# Altium PCB PCB.PcbDoc (part 2 of 9)
Units mil, origin at the board's own origin, x right, y up, seen from the top; angles counter-clockwise.
Board outline 4330.71 x 3149.61 mil, 8 copper layers (L1_TOP, L2_GND, L3_SIG, L4_PWR, L5_PWR, L6_SIG, L7_GND, L8_BOT), stack 62.406 mil thick; 660 components, 433 nets, 2602 pads, 1254 vias.
Unrouted connection lines stored in the file: 930.
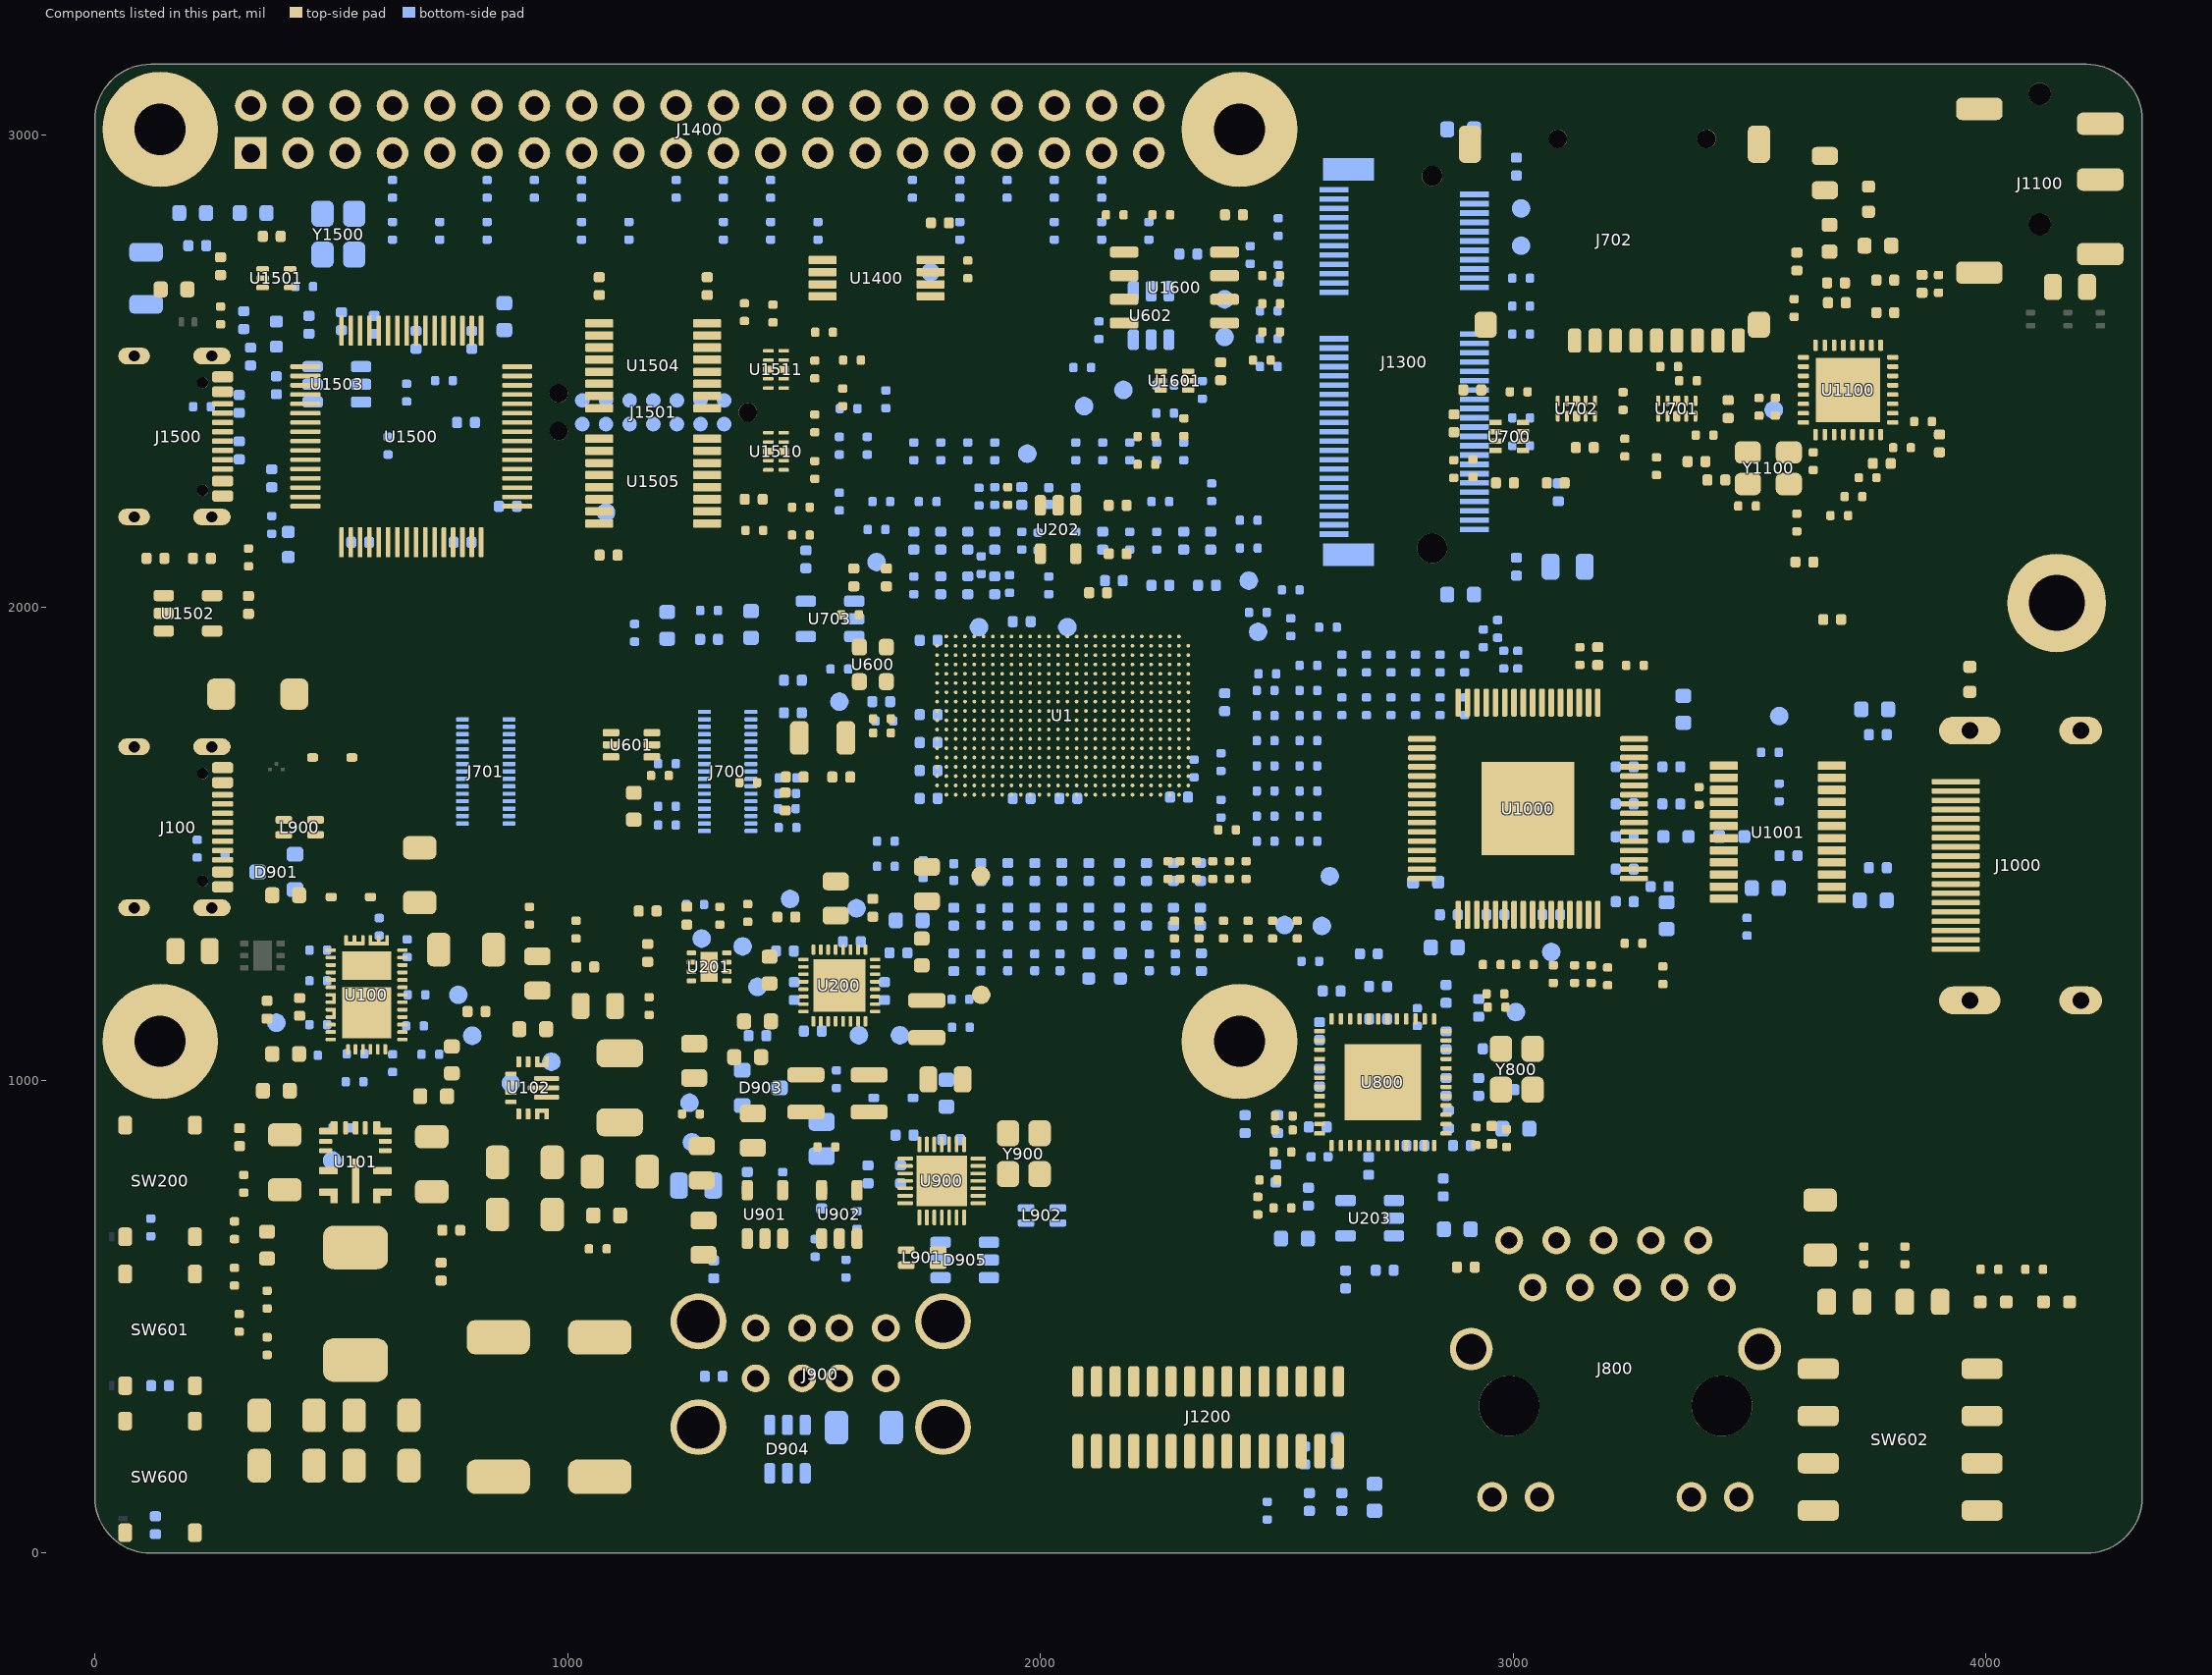
[diagram p6: the components of this part, seen from the top]

## Components (designator, comment, footprint, x,y, rotation, side; value= is the part's Value field where it differs from the comment) (continued)
R121 "100k" R0402 1172.24,1157.48 r270 top
R122 "100k" R0402 1017.72,1318.9 r270 top
R123 "680k" R0402 1063.98,643.7 r180 top
R124 "130k" R0402 1260.83,929.13 r0 top
R125 "100k" R0402 919.29,1348.43 r270 top
R200 "10k" R0402 118.11,688.98 r270 bottom
R201 "2.2k" R0402 1321.85,1348.43 r270 top
R202 "10k" R0402 2263.78,2470.47 r180 bottom
R203 "62R" R0402 2246.06,2141.73 r90 bottom
R204 "10k" R0402 2440.95,2125.98 r180 bottom
R205 "10k" R0402 1380.91,1354.33 r270 top
R206 "100k" R0402 1931.1,2236.22 r90 top
R208 "10k" R0402 1663.39,2224.41 r180 bottom
R209 "10k" R0402 1547.24,859.25 r0 top
R210 "10k" R0402 1653.54,2165.35 r180 bottom
R301 "40.2k" R0402 1903.54,2236.22 r90 bottom
R302 "4.87k" R0402 1870,2235 r270 bottom
R600 "22R" R0402 1665,1765 r0 top
R601 "10k" R0402 1597.44,1985.24 r0 top
R603 "10M" R0402 1665,1735 r0 top
R604 "10k" R0402 1601.69,2523.62 r180 top
R605 "10k" R0402 1381.89,1629.92 r0 top
R606 "4.7k" R0402 1195,1645 r0 top
R607 "10k" R0402 2124.02,2586.61 r270 bottom
R608 "10k" R0402 2088.58,2507.87 r0 bottom
R609 "10k" R0402 2263.78,2411.42 r180 bottom
R610 "10k" R0402 1574.8,2224.41 r270 bottom
R611 "10k" R0402 2460,1990 r0 bottom
R612 "10k" R0402 2381.89,1673.23 r270 bottom
R613 "10k" R0402 1574.8,1870.08 r180 bottom
R620 "10k" R0402 2476.38,1505.91 r0 bottom
R621 "10k" R0402 2566.93,1505.91 r0 bottom
R622 "10k" R0402 2476.38,1559.05 r0 bottom
R623 "10k" R0402 2566.93,1559.05 r0 bottom
R624 "10k" R0402 2476.38,1612.2 r0 bottom
R625 "10k" R0402 2566.93,1612.2 r0 bottom
R626 "10k" R0402 2480,1860 r0 bottom
R627 "10k" R0402 2566.93,1877.95 r0 bottom
R628 "10k" R0402 2980,1890 r270 bottom
R629 "10k" R0402 3010,1890 r90 bottom
R630 "10k" R0402 2937.2,1935.24 r270 bottom
R631 "10k" R0402 2967.28,1955.16 r90 bottom
R632 "10k" R0402 2897.64,1881.89 r270 bottom
R633 "10k" R0402 2897.64,1791.34 r270 bottom
R634 "10k" R0402 2845.67,1881.89 r270 bottom
R635 "10k" R0402 2845.67,1791.34 r270 bottom
R636 "10k" R0402 2793.7,1881.89 r270 bottom
R637 "10k" R0402 2793.7,1791.34 r270 bottom
R638 "10k" R0402 2741.73,1881.89 r270 bottom
R639 "10k" R0402 2741.73,1791.34 r270 bottom
R640 "10k" R0402 2689.76,1881.89 r270 bottom
R641 "10k" R0402 2689.76,1791.34 r270 bottom
R642 "10k" R0402 2637.8,1881.89 r270 bottom
R643 "10k" R0402 2637.8,1791.34 r270 bottom
R644 "1k" R0402 2476.38,1665.35 r0 bottom
R645 "47k" R0402 2566.93,1665.35 r0 bottom
R646 "1k" R0402 2476.38,1718.5 r0 bottom
R647 "47k" R0402 2566.93,1718.5 r0 bottom
R648 "1k" R0402 2476.38,1771.65 r0 bottom
R649 "47k" R0402 2566.93,1771.65 r0 bottom
R650 "1k" R0402 2476.38,1824.8 r0 bottom
R651 "47k" R0402 2566.93,1824.8 r180 bottom
R700 "22R" R0402 1670,1760 r180 bottom
R701 "47k" R0402 1673.23,1452.76 r0 bottom
R702 "47k" R0402 1673.23,1505.91 r0 bottom
R703 "47k" R0402 1464.66,1607.05 r180 bottom
R704 "47k" R0402 1465,1640 r180 bottom
R705 "47k" R0402 1210,1670 r0 bottom
R706 "47k" R0402 1210,1580 r0 bottom
R707 "47k" R0402 1210,1540 r0 bottom
R708 "47k" R0402 1465,1535 r180 bottom
R709 "47k" R0402 1463.7,1575 r180 bottom
R710 "10k" R0402 2529.53,1958.66 r270 bottom
R711 "1k" R0402 1141.73,1946.85 r270 bottom
R712 "10k" R0402 1269.68,1372.05 r180 bottom
R713 "10k" R0402 1299.21,1994.09 r0 bottom
R720 "4.7k" R0402 2395,1530 r0 top
R721 "10k" R0402 2874.41,2293.31 r90 top
R722 "10k" R0402 2915,2295 r90 top
R723 "47k" R0402 3236.42,2338.58 r90 top
R724 "47k" R0402 3370,2480 r0 top
R725 "47k" R0402 3405,2365 r180 top
R726 "47k" R0402 3012.01,2456.69 r0 top
R727 "47k" R0402 3232.48,2437.01 r90 top
R728 "47k" R0402 3330,2510 r180 top
R730 "100R" R0402 3594.69,2633.86 r90 top
R731 "47k" R0402 2342.52,2460.63 r90 bottom
R732 "10k" R0402 3303.35,2299.21 r270 top
R800 "22R" R0402 2295,1445 r270 top
R801 "22R" R0402 2270,1445 r270 top
R802 "22R" R0402 2435,1445 r270 top
R803 "22R" R0402 2400,1445 r270 top
R804 "22R" R0402 2365,1445 r270 top
R805 "22R" R0402 2330,1445 r270 top
R806 "22R" R0402 2543.31,1318.9 r90 top
R807 "22R" R0402 2283.47,1318.9 r90 top
R808 "22R" R0402 2491.34,1318.9 r90 top
R809 "22R" R0402 2439.37,1318.9 r90 top
R810 "22R" R0402 2387.4,1318.9 r90 top
R811 "22R" R0402 2335.43,1318.9 r90 top
R812 "11k" R0402 2921.26,881.89 r90 top
R813 "2.2k" R0402 2986.22,877.95 r90 top
R814 "2.2k" R0402 2515,925 r0 top
R815 "1.5k" R0402 2511.81,848.42 r0 top
R820 "5.76k" R0402 2797.24,1133.86 r270 bottom
R821 "2.49k" R0402 2570.87,1251.97 r180 bottom
R822 "10k" R0402 2515,895 r0 top
R823 "2.49k" R0402 2482.28,789.37 r180 top
R840 "470R" R0402 2511.81,730.32 r180 top
R841 "470R" R0402 2460,735 r270 top
R902 "3.48k" R0402 275.59,1460.63 r90 bottom
R903 "16.5k" R0402 216.54,1490.16 r90 bottom
R904 "10k" R0402 1751.97,1446.85 r270 bottom
R905 "10k" R0402 2253.94,2224.41 r0 bottom
R906 "1.5k" R0402 1568.7,1002.44 r90 bottom
R907 "3.9k" R0402 1588.58,601.89 r270 bottom
R908 "10k" R0402 1523.62,645.67 r90 bottom
R909 "10k" R0402 1612.2,704.72 r270 bottom
R910 "3.48k" R0402 1831.69,1112.2 r180 bottom
R911 "16.5k" R0402 1830.71,1171.26 r0 bottom
R912 "10k" R0402 2381.89,1574.8 r270 bottom
R913 "100k" R0402 1454.72,787.4 r90 bottom
R1000 "22R" R0402 2325,1660 r90 bottom
R1001 "10k" R0402 3200,1220 r270 top
R1002 "10k" R0402 3255,1290 r180 top
R1003 "10k" R0402 3316.93,1222.44 r270 top
R1004 "10k" R0402 2965,1155 r180 top
R1005 "10k" R0402 3141.19,1897.64 r90 top
R1006 "10k" R0402 3130,1225 r270 top
R1007 "5.1k" R0402 3165,1225 r90 top
R1008 "510R" R0402 3393.32,1601.6 r270 top
R1009 "10k" R0402 3495,1325 r270 bottom
R1010 "10k" R0402 3562.99,1609.25 r270 bottom
R1011 "100k" R0402 3543.31,1693.9 r180 bottom
R1012 "10k" R0402 2962.6,1183.07 r0 top
R1013 "10k" R0402 3257.87,1877.95 r180 top
R1014 "10k" R0402 2955,1245 r0 top
R1015 "10k" R0402 3025,1245 r180 top
R1016 "10k" R0402 3085,1225 r90 top
R1100 "2.2k" R0402 2224.41,2362.2 r0 top
R1101 "2.2k" R0402 2224.41,2303.15 r0 top
R1102 "47R" R0402 3822.69,2338.37 r180 top
R1103 "47R" R0402 3866.99,2393.6 r180 top
R1104 "22R" R0402 3635,2310 r90 top
R1105 "2.2k" R0402 3900,2685 r90 top
R1106 "10k" R0402 3495,2215 r0 top
R1107 "10k" R0402 3520,2425 r90 top
R1108 "10k" R0402 3555,2425 r90 top
R1109 "100k" R0402 3600,2180 r270 top
R1110 "100k" R0402 3690,2195 r0 top
R1111 "100k" R0402 3720,2235 r0 top
R1112 "100k" R0402 3750,2275 r0 top
R1200 "2.2k" R0402 2440.95,2185.04 r180 bottom
R1201 "2.2k" R0402 2362.2,2244.09 r270 bottom
R1202 "10k" R0402 2480,90 r90 bottom
R1305 "47k" R0402 2503.15,2805.12 r270 bottom
R1306 "47k" R0402 2503.15,2706.69 r90 bottom
R1307 "47k" R0402 2483.47,2627.95 r0 bottom
R1308 "47k" R0402 2444.09,2746.06 r270 bottom
R1309 "47k" R0402 2483.47,2568.9 r0 bottom
R1310 "10k" R0402 2188.98,2141.73 r90 bottom
R1311 "10k" R0402 2483.47,2509.84 r0 bottom
R1312 "2.2k" R0402 3016.93,2342.52 r0 bottom
R1315 "10k" R0402 3016.93,2401.57 r0 bottom
R1316 "33R" R0402 3016.93,2578.74 r180 bottom
R1317 "10k" R0402 3016.93,2696.85 r180 bottom
R1319 "100k" R0402 3016.93,2637.8 r180 bottom
R1322 "47k" R0402 2529.53,2037.4 r180 bottom
R1323 "47k" R0402 2608.27,1958.66 r180 bottom
R1400 "33R" R0402 629.53,2885.83 r90 bottom
R1401 "33R" R0402 829.53,2885.83 r90 bottom
R1402 "33R" R0402 929.53,2885.83 r90 bottom
R1403 "33R" R0402 1029.53,2885.83 r90 bottom
R1404 "33R" R0402 1229.53,2885.83 r90 bottom
R1405 "33R" R0402 1329.53,2885.83 r90 bottom
R1406 "33R" R0402 1429.53,2885.83 r90 bottom
R1407 "33R" R0402 1729.53,2885.83 r90 bottom
R1408 "33R" R0402 1829.53,2885.83 r90 bottom
R1409 "33R" R0402 1929.53,2885.83 r90 bottom
R1410 "33R" R0402 2029.53,2885.83 r90 bottom
R1411 "33R" R0402 2129.53,2885.83 r90 bottom
R1412 "33R" R0402 629.53,2797.24 r90 bottom
R1413 "33R" R0402 729.53,2797.24 r90 bottom
R1414 "33R" R0402 829.53,2797.24 r90 bottom
R1415 "33R" R0402 1029.53,2797.24 r90 bottom
R1416 "33R" R0402 1129.53,2797.24 r90 bottom
R1417 "33R" R0402 1329.53,2797.24 r90 bottom
R1418 "33R" R0402 1429.53,2797.24 r90 bottom
R1419 "33R" R0402 1529.53,2797.24 r90 bottom
R1420 "33R" R0402 1829.53,2797.24 r90 bottom
R1421 "33R" R0402 2029.53,2797.24 r90 bottom
R1422 "33R" R0402 2129.53,2797.24 r90 bottom
R1423 "33R" R0402 2229.53,2797.24 r90 bottom
R1424 "62R" R0402 1875,2090 r90 bottom
R1425 "62R" R0402 1732.28,2047.24 r90 bottom
R1426 "62R" R0402 1935,2050 r90 bottom
R1427 "62R" R0402 2017.72,2047.24 r90 bottom
R1428 "1.8k" R0402 1574.8,2342.52 r270 bottom
R1429 "1.8k" R0402 1633.86,2342.52 r270 bottom
R1430 "3.9k" R0402 1594.49,2421.26 r0 bottom
R1431 "3.9k" R0402 1673.23,2440.95 r90 bottom
R1432 "1k" R0402 1846.46,2715.55 r270 top
R1433 "47k" R0402 2303.15,2330.71 r270 bottom
R1500 "5.1k" R0402 265.75,2618.11 r90 top
R1501 "5.1k" R0402 324.8,2106.3 r270 top
R1503 "12k" R0402 620.08,2342.52 r270 bottom
R1504 "1k" R0402 374.02,2175.2 r90 bottom
R1505 "10k" R0402 1374.02,2625 r270 top
R1507 "2.2k" R0402 659.45,2454.72 r270 bottom
R1508 "10k" R0402 442.91,2679.13 r0 bottom
R1509 "10k" R0402 226.38,2425.2 r0 bottom
R1510 "10k" R0402 738.19,2480.32 r180 bottom
R1511 "10k" R0402 2074.8,2330.71 r270 bottom
R1512 "10k" R0402 2131.89,2330.71 r270 bottom
R1513 "10k" R0402 2188.98,2330.71 r270 bottom
R1514 "10k" R0402 2246.06,2330.71 r270 bottom
R1515 "10k" R0402 1732.28,2330.71 r270 bottom
R1516 "10k" R0402 1789.37,2330.71 r270 bottom
R1517 "10k" R0402 1846.46,2330.71 r270 bottom
R1518 "10k" R0402 1903.54,2330.71 r270 bottom
R1520 "22R" R0402 2074.8,2141.73 r90 bottom
R1521 "22R" R0402 1522.95,2389.76 r90 top
R1522 "100R" R0402 1493.43,2153.54 r0 top
R1523 "10k" R0402 1522.95,2291.34 r90 top
R1524 "10k" R0402 1493.43,2212.6 r180 top
R1525 "10k" R0402 1395,2163.39 r0 top
R1526 "10k" R0402 1434.37,2622.05 r270 top
R1527 "10k" R0402 1522.95,2503.94 r270 top
R1528 "4.7k" R0402 1542.64,2582.68 r0 top
R1529 "4.7k" R0402 1582.01,2444.88 r90 top
R1600 "10k" R0402 2157.48,2830.91 r0 top
R1601 "10k" R0402 2255.91,2830.91 r0 top
R1602 "10k" R0402 2488.19,2702.16 r0 top
R1603 "10k" R0402 2488.19,2643.11 r180 top
R1604 "10k" R0402 2303.54,2381.89 r90 top
R1605 "2.2k" R0402 2488.19,2583.27 r180 top
R1606 "2.2k" R0402 2468.5,2523.43 r180 top
R1607 "330R" R0402 3742.13,629.92 r270 top
R1608 "330R" R0402 3828.74,629.92 r270 top
R1609 "1k" R0402 4007.87,600.39 r180 top
R1610 "1k" R0402 4102.36,600.39 r0 top
R1620 "47R" R0402 1960.63,2141.73 r90 bottom
R1621 "47R" R0402 1995,2140 r90 bottom
SW200 "TS-1187A-B-A-B (POWER)" SW_TACT_5.1X5.1_SMD4 137.8,787.4 r90 top
SW600 "TS-1187A-B-A-B (RESET)" SW_TACT_5.1X5.1_SMD4 137.8,161.42 r90 top
SW601 "TS-1187A-B-A-B (USER)" SW_TACT_5.1X5.1_SMD4 137.8,472.44 r90 top
SW602 "2.54-4P TPGT (BOOT B3..B6)" SW_DIP4_SMD_2.54 3818.9,240.16 r90 top
TP100 "SINK_EN# (low = sink path on)" TP_PAD_1.0 729.33,1275.59 r180 bottom
TP101 "PLUG_EVENT" TP_PAD_1.0 383.86,1122.05 r180 bottom
TP102 "PLUG_FLIP" TP_PAD_1.0 768.7,1181.1 r180 bottom
TP103 "DBG_ACC" TP_PAD_1.0 798.23,1094.49 r180 bottom
TP104 "3V3_MAIN PGOOD" TP_PAD_1.0 501.97,830.71 r180 bottom
TP105 "5V0 PG" TP_PAD_1.0 879.92,994.09 r180 bottom
TP200 "MODE/RESET" TP_PAD_1.0 1616.14,1095.47 r180 bottom
TP201 "MODE/STBY" TP_PAD_1.0 1702.76,1095.47 r180 bottom
TP202 "GPO1" TP_PAD_1.0 1611.22,1364.17 r180 bottom
TP203 "GPIO" TP_PAD_1.0 1401.57,1197.84 r180 bottom
TP204 "LDO2" TP_PAD_1.0 1370.28,1283.47 r180 bottom
TP300 "VSYS_PD" TP_PAD_1.0 965.55,1039.37 r180 bottom
TP301 "VCC_5V0" TP_PAD_1.0 1972.44,2325.79 r180 bottom
TP302 "VCC_3V3_MAIN" TP_PAD_1.0 1262.8,869.09 r180 bottom
TP303 "VCC_3V3_SYS" TP_PAD_1.0 2516.73,1328.74 r180 bottom
TP304 "VDD_CORE_0V85" TP_PAD_1.0 2092.52,2426.38 r180 bottom
TP305 "VDDR_CORE_0V85" TP_PAD_1.0 2612.2,1431.89 r180 bottom
TP306 "VDDS_DDR_1V2" TP_PAD_1.0 1257.87,952.76 r180 bottom
TP307 "DDR4_VPP_2V5_SIP" TP_PAD_1.0 1874.02,1433.07 r0 top
TP308 "VDD_1V8" TP_PAD_1.0 2595.47,1326.77 r180 bottom
TP309 "VDDA_1V8" TP_PAD_1.0 1875,1181.1 r0 top
TP310 "VDDS_OSC0_1V8" TP_PAD_1.0 1283.47,1300 r180 bottom
TP311 "VDDSHV5_SD" TP_PAD_1.0 3551.38,2418.31 r180 bottom
TP312 "VDD_1V0_PHY" TP_PAD_1.0 3005.91,1144.49 r180 bottom
TP600 "Cold reset: short to GND" TP_PAD_1.0 1470.47,1383.86 r180 bottom
TP601 "MCU_PORz" TP_PAD_1.0 1870.08,1958.66 r180 bottom
TP602 "MCU_RESETz" TP_PAD_1.0 2057.09,1958.66 r180 bottom
TP603 "RESETSTATz" TP_PAD_1.0 2460.63,1948.82 r180 bottom
TP604 "PORz_OUT" TP_PAD_1.0 2440.95,2057.09 r180 bottom
TP605 "MCU_ERRORn (1.8 V)" TP_PAD_1.0 1653.54,2096.46 r180 bottom
TP606 "MCU_RESETSTATz (test only, erratum i2407)" TP_PAD_1.0 1574.8,1801.18 r180 bottom
TP1000 "MSEN (receiver sense)" TP_PAD_1.0 3080.71,1271.65 r180 bottom
TP1001 "CEC_A (unused, 10k internal pull-up)" TP_PAD_1.0 3562.99,1770.67 r180 bottom
TP1300 "BT wake (no SoC GPIO)" TP_PAD_1.0 3016.93,2765.75 r180 bottom
TP1301 "VIO_CFG (low = 3.3 V-only card)" TP_PAD_1.0 3016.93,2844.49 r180 bottom
TP1400 "HAT_ID_WP: short to GND to write" TP_PAD_1.0 1767.72,2709.65 r180 bottom
TP1500 "JTAG_SRST_N" TP_PAD_1.0 1081.1,2201.38 r180 bottom
TP1600 "TMP102 ALERT" TP_PAD_1.0 2175.59,2460.63 r180 bottom
TP1601 "I2C0_SCL" TP_PAD_1.0 2389.76,2652.16 r180 bottom
TP1602 "I2C0_SDA" TP_PAD_1.0 2389.76,2572.64 r180 bottom
U1 "OSD6254-1G-IPM" OSD62X-PM_BGA500 2047.24,1771.65 r0 top
U100 "TPS25730DREFR" WQFN38_REF_4X6 574.8,1181.1 r90 top
U101 "LM61460AANRJRR" VQFN-HR14_RJR_3.5X4 551.18,826.77 r270 top
U102 "TPS63070RNMR" VQFN-HR15_RNM_2.5X3 925.2,984.25 r0 top
U200 "TPS6521904RSMR" VQFN32_RSM_4X4 1574.8,1200.79 r180 top
U201 "TPS22965DSGR" WSON8_DSG_2X2 1299.21,1240.16 r0 top
U202 "TLV75518PDBVR (DNP)" SOT23-5 2037.4,2165.35 r270 top
U203 "TLV75710PDBVR" SOT23-5 2696.85,708.66 r180 bottom
U600 "ECS-2520MV-250-CN-TR" OSC_2520_4P 1645.67,1879.92 r0 top
U601 "74LVC1G11GW,125" SC70-6 1135,1710 r0 top
U602 "SN74LVC2G17DBVR" SOT23-6 2234.25,2618.11 r90 bottom
U700 "TPS22996DRLR" SOT583-8 2992.13,2362.2 r0 top
U701 "TPD4E05U06DQAR" USON10_DQA 3346.46,2421.26 r90 top
U702 "TPD4E05U06DQAR" USON10_DQA 3133.86,2421.26 r270 top
U703 "SN74LVC1G08DBVR" SOT23-5 1555.12,1976.38 r180 bottom
U800 "DP83867ISRGZR" VQFN48_RGZ_7X7 2724.41,996.06 r90 top
U900 "CH335F" QFN28_4X4_P0.4 1791.34,787.4 r90 top
U901 "TPS2051BDBVR" SOT23-5 1417.32,716.54 r90 top
U902 "TPS2051BDBVR" SOT23-5 1574.8,716.54 r90 top
U1000 "TFP410PAPR" HTQFP64_PAP_10X10 3031.5,1574.8 r90 top
U1001 "TPD12S016PWR" TSSOP24_4.4X7.8_P0.65 3560,1525 r0 top
U1100 "TLV320AIC3104IRHBR" VQFN32_RHB_5X5 3708.66,2460.63 r90 top
U1400 "BL24C32A-SFRC (DNP)" TSSOP8_4.4X3.0_P0.65 1653.54,2696.85 r0 top
U1500 "FT4232HL-REEL" LQFP64_10X10_P0.5 669.29,2362.2 r0 top
U1501 "TPD2E001DRLR" SOT553-5 383.86,2696.85 r0 top
U1502 "AP2112K-3.3TRG1" SOT23-5 196.85,1988.19 r0 top
U1503 "93LC46BT-I/OT" SOT23-6 511.81,2472.44 r180 bottom
U1504 "SN74AVC4T245PWR" TSSOP16_4.4X5.0_P0.65 1181.1,2511.81 r0 top
U1505 "SN74AVC4T245PWR" TSSOP16_4.4X5.0_P0.65 1181.1,2267.72 r0 top
U1510 "TPD4E05U06DQAR" USON10_DQA 1440.95,2330.71 r0 top
U1511 "TPD4E05U06DQAR" USON10_DQA 1440.95,2503.94 r0 top
U1600 "AT24C512C-SSHD-T" SOIC8_3.9X4.9_P1.27 2283.47,2677.16 r0 top
U1601 "TMP102AIDRLR" SOT563-6 2283.47,2480.32 r0 top
Y600 "32.768kHz" XTAL_EPSON_FC-135 1539.37,1724.41 r180 top
Y800 "X322525MOB4SI" XTAL_3225_4P 3007.87,1023.62 r0 top
Y900 "FL1200074" XTAL_3225_4P 1965,845 r180 top
Y1100 "MC3225Z12.2880C19XSH" OSC_3225_4P 3540,2295 r90 top
Y1500 "12MHz" XTAL_3225_4P 515,2790 r180 bottom

## Footprints (in the part's own frame and the unit in brackets; to place one, negate y for a bottom-side part, rotate by r counter-clockwise, add the part's x,y. Pads: shape width x height; smd on the part's side, far side on the other; paste and mask are expansions set on the pad)
B2B_LSM_GB042-30P-H10 [mm] "LS Mtron GB042-30P-H10 0.4 mm board-to-board plug, 30 contacts, 1.0 mm stack, no hold-downs"
  rrect50% 0.23x0.7 smd: 1(-2.8,-1.25) 2(-2.4,-1.25) 3(-2,-1.25) 4(-1.6,-1.25) 5(-1.2,-1.25) 6(-0.8,-1.25) 7(-0.4,-1.25) 8(0,-1.25) 9(0.4,-1.25) 10(0.8,-1.25) 11(1.2,-1.25) 12(1.6,-1.25) 13(2,-1.25) 14(2.4,-1.25) 15(2.8,-1.25) 16(2.8,1.25) 17(2.4,1.25) 18(2,1.25) 19(1.6,1.25) 20(1.2,1.25) 21(0.8,1.25) 22(0.4,1.25) 23(0,1.25) 24(-0.4,1.25) 25(-0.8,1.25) 26(-1.2,1.25) 27(-1.6,1.25) 28(-2,1.25) 29(-2.4,1.25) 30(-2.8,1.25)
  silkscreen extent -3.75,-2.12 3.75,1.1
B2B_LSM_GB042-34P-H10 [mm] "LS Mtron GB042-34P-H10 0.4 mm board-to-board plug, 34 contacts, 1.0 mm stack, no hold-downs"
  rrect50% 0.23x0.7 smd: 1(-3.2,-1.25) 2(-2.8,-1.25) 3(-2.4,-1.25) 4(-2,-1.25) 5(-1.6,-1.25) 6(-1.2,-1.25) 7(-0.8,-1.25) 8(-0.4,-1.25) 9(0,-1.25) 10(0.4,-1.25) 11(0.8,-1.25) 12(1.2,-1.25) 13(1.6,-1.25) 14(2,-1.25) 15(2.4,-1.25) 16(2.8,-1.25) 17(3.2,-1.25) 18(3.2,1.25) 19(2.8,1.25) 20(2.4,1.25) 21(2,1.25) 22(1.6,1.25) 23(1.2,1.25) 24(0.8,1.25) 25(0.4,1.25) 26(0,1.25) 27(-0.4,1.25) 28(-0.8,1.25) 29(-1.2,1.25) 30(-1.6,1.25) 31(-2,1.25) 32(-2.4,1.25) 33(-2.8,1.25) 34(-3.2,1.25)
  silkscreen extent -4.15,-2.12 4.15,1.1
C0402 [mm] "MLCC 0402 (1005), Samsung reflow land"
  rrect50% 0.54x0.6 smd: 1(-0.48,0) 2(0.48,0)
C0603 [mm] "MLCC 0603 (1608), Samsung reflow land"
  rrect50% 0.76x0.85 smd: 1(-0.72,0) 2(0.72,0)
C0805 [mm] "MLCC 0805 (2012), Samsung reflow land"
  rrect50% 0.96x1.4 smd: 1(-0.92,0) 2(0.92,0)
C1206 [mm] "MLCC 1206 (3216), Samsung reflow land"
  rrect50% 1.25x1.8 smd: 1(-1.475,0) 2(1.475,0)
  silkscreen extent -0.58,-0.8 0.58,0.8
CMC_SUNLORD_SDCW2012 [mm] "Sunlord SDCW2012 common-mode choke 2.0x1.2 mm, 4 pads (A 1-2, B 4-3), Sunlord recommended land"
  rrect50% 0.9x0.4 smd: 1(-0.85,0.4) 2(0.85,0.4) 3(0.85,-0.4) 4(-0.85,-0.4)
CP_SMD_D6.3X5.8 [mm] "Polymer aluminium capacitor D6.3 x L5.8 SMD (6.6 mm base), IPC-7351B nominal land, pad 1 = +"
  rrect50% 3.4x1.85 smd: 1(-2.725,0) 2(2.725,0)
  silkscreen extent -5.32,-3.3 3.3,3.3
DIO_SMA [mm] "SMA (DO-214AC) diode, pad 1 anode / pad 2 cathode, MDD suggested pad layout"
  rrect50% 1.52x1.68 smd: 1(-1.965,0) 2(1.965,0)
  silkscreen extent -2.07,-1.28 3.02,1.28
FB0402 [mm] "Ferrite bead 0402 (1005), Murata BLM15P reflow land"
  rrect50% 0.5x0.5 smd: 1(-0.45,0) 2(0.45,0)
FB0603 [mm] "Ferrite bead 0603 (1608), Murata BLM18P/S/K reflow land"
  rrect50% 0.65x0.7 smd: 1(-0.675,0) 2(0.675,0)
FPC_TE_1-1734248-5 [mm] "TE 1-1734248-5 15-pos 1.0 mm FPC connector, ZIF vertical, SMT, two tails per circuit"
  rrect50% 0.6x1.65 smd: 1(7,-1.475) 2(6,-1.475) 3(5,-1.475) 4(4,-1.475) 5(3,-1.475) 6(2,-1.475) 7(1,-1.475) 8(0,-1.475) 9(-1,-1.475) 10(-2,-1.475) 11(-3,-1.475) 12(-4,-1.475) 13(-5,-1.475) 14(-6,-1.475) 15(-7,-1.475)
  rrect50% 0.6x1.85 smd: 1(7,2.275) 2(6,2.275) 3(5,2.275) 4(4,2.275) 5(3,2.275) 6(2,2.275) 7(1,2.275) 8(0,2.275) 9(-1,2.275) 10(-2,2.275) 11(-3,2.275) 12(-4,2.275) 13(-5,2.275) 14(-6,2.275) 15(-7,2.275)
  silkscreen extent -11.2,-2.25 11.2,3.72
FUSE_BHFUSE_BSMD1206 [mm] "PTC resettable fuse 1206, BHFUSE BSMD1206 recommended pad layout"
  rrect50% 1x1.8 smd: 1(-1.4,0) 2(1.4,0)
  silkscreen extent -0.63,-0.8 0.63,0.8
HDMI_A_XFCN_19F_S_D [mm] "XFCN HDMI-A-19F-S-D HDMI type-A receptacle, 19 SMD contacts 0.5 mm + 4 plated shell slots"
  rrect50% 0.3x2.6 smd: 1(4.5,5.32) 2(4,5.32) 3(3.5,5.32) 4(3,5.32) 5(2.5,5.32) 6(2,5.32) 7(1.5,5.32) 8(1,5.32) 9(0.5,5.32) 10(0,5.32) 11(-0.5,5.32) 12(-1,5.32) 13(-1.5,5.32) 14(-2,5.32) 15(-2.5,5.32) 16(-3,5.32) 17(-3.5,5.32) 18(-4,5.32) 19(-4.5,5.32)
  oval 1.5x3.3 hole 0.9 slot 2.7 at 90 deg: 20(7.25,4.56) 21(-7.25,4.56)
  oval 1.5x2.3 hole 0.9 slot 1.7 at 90 deg: 22(7.25,-1.4) 23(-7.25,-1.4)
  silkscreen extent -7.25,-5.9 7.25,7.14
HDR_2X20_P2.54_THT [mm] "Pin header 2x20 2.54 mm THT, Raspberry Pi 40-pin numbering (HanElectricity 2541WV-2x20P)"
  rect 1.7x1.7 hole 1: 1(-24.13,-1.27)
  round 1.7 hole 1: 2(-24.13,1.27) 3(-21.59,-1.27) 4(-21.59,1.27) 5(-19.05,-1.27) 6(-19.05,1.27) 7(-16.51,-1.27) 8(-16.51,1.27) 9(-13.97,-1.27) 10(-13.97,1.27) 11(-11.43,-1.27) 12(-11.43,1.27) 13(-8.89,-1.27) 14(-8.89,1.27) 15(-6.35,-1.27) 16(-6.35,1.27) 17(-3.81,-1.27) 18(-3.81,1.27) 19(-1.27,-1.27) 20(-1.27,1.27) 21(1.27,-1.27) 22(1.27,1.27) 23(3.81,-1.27) 24(3.81,1.27) 25(6.35,-1.27) 26(6.35,1.27) 27(8.89,-1.27) 28(8.89,1.27) 29(11.43,-1.27) 30(11.43,1.27) 31(13.97,-1.27) 32(13.97,1.27) 33(16.51,-1.27) 34(16.51,1.27) 35(19.05,-1.27) 36(19.05,1.27) 37(21.59,-1.27) 38(21.59,1.27) 39(24.13,-1.27) 40(24.13,1.27)
  silkscreen extent -25.4,-3.02 25.4,2.5
HTQFP64_PAP_10X10 [mm] "TI HTQFP-64 PowerPAD (PAP), 10x10 mm, 0.5 mm pitch, 5.0 mm exposed pad (TFP410)"
  rrect50% 1.5x0.3 smd: 1(-5.7,3.75) 2(-5.7,3.25) 3(-5.7,2.75) 4(-5.7,2.25) 5(-5.7,1.75) 6(-5.7,1.25) 7(-5.7,0.75) 8(-5.7,0.25) 9(-5.7,-0.25) 10(-5.7,-0.75) 11(-5.7,-1.25) 12(-5.7,-1.75) 13(-5.7,-2.25) 14(-5.7,-2.75) 15(-5.7,-3.25) 16(-5.7,-3.75) 33(5.7,-3.75) 34(5.7,-3.25) 35(5.7,-2.75) 36(5.7,-2.25) 37(5.7,-1.75) 38(5.7,-1.25) 39(5.7,-0.75) 40(5.7,-0.25) 41(5.7,0.25) 42(5.7,0.75) 43(5.7,1.25) 44(5.7,1.75) 45(5.7,2.25) 46(5.7,2.75) 47(5.7,3.25) 48(5.7,3.75)
  rrect50% 0.3x1.5 smd: 17(-3.75,-5.7) 18(-3.25,-5.7) 19(-2.75,-5.7) 20(-2.25,-5.7) 21(-1.75,-5.7) 22(-1.25,-5.7) 23(-0.75,-5.7) 24(-0.25,-5.7) 25(0.25,-5.7) 26(0.75,-5.7) 27(1.25,-5.7) 28(1.75,-5.7) 29(2.25,-5.7) 30(2.75,-5.7) 31(3.25,-5.7) 32(3.75,-5.7) 49(3.75,5.7) 50(3.25,5.7) 51(2.75,5.7) 52(2.25,5.7) 53(1.75,5.7) 54(1.25,5.7) 55(0.75,5.7) 56(0.25,5.7) 57(-0.25,5.7) 58(-0.75,5.7) 59(-1.25,5.7) 60(-1.75,5.7) 61(-2.25,5.7) 62(-2.75,5.7) 63(-3.25,5.7) 64(-3.75,5.7)
  rect 5x5 smd: 65(0,0)
  silkscreen extent -6.97,-5 5,5
IND_MURATA_DFE252012F [mm] "Murata DFE252012F metal-alloy power inductor 2.5x2.0 mm, Murata recommended land"
  rrect50% 0.8x2 smd: 1(-1,0) 2(1,0)
  silkscreen extent -0.33,-1 0.33,1
IND_SUNLORD_MWSA0402S [mm] "Sunlord MWSA0402S molded power inductor 4.4x4.2 mm, Sunlord recommended land"
  rrect50% 1.5x2.5 smd: 1(-1.85,0) 2(1.85,0)
  silkscreen extent -2.2,-2.1 2.2,2.1
IND_SUNLORD_MWSA0603S [mm] "Sunlord MWSA0603S molded power inductor 7.0x6.6 mm, Sunlord recommended land"
  rrect50% 2.35x3.5 smd: 1(-3.025,0) 2(3.025,0)
  silkscreen extent -3.5,-3.3 3.5,3.3
JACK_HRO_PJ-320DB [mm] "HRO PJ-320DB 3.5 mm 4-pole SMD audio jack, 5 pads + 2 locating posts"
  rrect50% 2.5x1.2 smd: 1(3.25,5.15) 2(-3.25,4.15) 3(-3.25,0.15) 4(-3.25,-2.85) 5(3.25,-3.65)
  round 1.2 hole 1.2 unplated: ""(0,2.55) ""(0,-4.45)
  silkscreen extent -3.05,-6.05 5.02,6.05
LED0603 [mm] "LED 0603 (1608), KENTO KT-0603R land, pad 1 anode, pad 2 cathode"
  rrect50% 0.7x0.7 smd: 1(-0.7,0) 2(0.7,0)
  silkscreen extent 1.35,-0.35 1.35,0.35
LED0805 [mm] "LED 0805 (2012), KENTO KT-0805G land, pad 1 anode, pad 2 cathode"
  rrect50% 1x1.4 smd: 1(-0.95,0) 2(0.95,0)
  silkscreen extent 1.75,-0.7 1.75,0.7
LQFP64_10X10_P0.5 [mm] "LQFP-64, 10x10 mm, 0.5 mm pitch, IPC-7351B nominal lands (FT4232HL)"
  rrect50% 1.625x0.25 smd: 1(-5.687,3.75) 2(-5.687,3.25) 3(-5.687,2.75) 4(-5.687,2.25) 5(-5.687,1.75) 6(-5.687,1.25) 7(-5.687,0.75) 8(-5.687,0.25) 9(-5.687,-0.25) 10(-5.687,-0.75) 11(-5.687,-1.25) 12(-5.687,-1.75) 13(-5.687,-2.25) 14(-5.687,-2.75) 15(-5.687,-3.25) 16(-5.687,-3.75) 33(5.687,-3.75) 34(5.687,-3.25) 35(5.687,-2.75) 36(5.687,-2.25) 37(5.687,-1.75) 38(5.687,-1.25) 39(5.687,-0.75) 40(5.687,-0.25) 41(5.687,0.25) 42(5.687,0.75) 43(5.687,1.25) 44(5.687,1.75) 45(5.687,2.25) 46(5.687,2.75) 47(5.687,3.25) 48(5.687,3.75)
  rrect50% 0.25x1.625 smd: 17(-3.75,-5.687) 18(-3.25,-5.687) 19(-2.75,-5.687) 20(-2.25,-5.687) 21(-1.75,-5.687) 22(-1.25,-5.687) 23(-0.75,-5.687) 24(-0.25,-5.687) 25(0.25,-5.687) 26(0.75,-5.687) 27(1.25,-5.687) 28(1.75,-5.687) 29(2.25,-5.687) 30(2.75,-5.687) 31(3.25,-5.687) 32(3.75,-5.687) 49(3.75,5.687) 50(3.25,5.687) 51(2.75,5.687) 52(2.25,5.687) 53(1.75,5.687) 54(1.25,5.687) 55(0.75,5.687) 56(0.25,5.687) 57(-0.25,5.687) 58(-0.75,5.687) 59(-1.25,5.687) 60(-1.75,5.687) 61(-2.25,5.687) 62(-2.75,5.687) 63(-3.25,5.687) 64(-3.75,5.687)
  silkscreen extent -7.02,-5 5,5
M2_KEYE_APCI0085 [mm] "LOTES APCI0085-P002A M.2 Key-E socket, 67 contacts 0.5 mm, H3.2, SMT"
  rect 0.3x1.55 smd: 1(-9.25,3.92) 2(-9,-3.63) 3(-8.75,3.92) 4(-8.5,-3.63) 5(-8.25,3.92) 6(-8,-3.63) 7(-7.75,3.92) 8(-7.5,-3.63) 9(-7.25,3.92) 10(-7,-3.63) 11(-6.75,3.92) 12(-6.5,-3.63) 13(-6.25,3.92) 14(-6,-3.63) 15(-5.75,3.92) 16(-5.5,-3.63) 17(-5.25,3.92) 18(-5,-3.63) 19(-4.75,3.92) 20(-4.5,-3.63) 21(-4.25,3.92) 22(-4,-3.63) 23(-3.75,3.92) 32(-1.5,-3.63) 33(-1.25,3.92) 34(-1,-3.63) 35(-0.75,3.92) 36(-0.5,-3.63) 37(-0.25,3.92) 38(0,-3.63) 39(0.25,3.92) 40(0.5,-3.63) 41(0.75,3.92) 42(1,-3.63) 43(1.25,3.92) 44(1.5,-3.63) 45(1.75,3.92) 46(2,-3.63) 47(2.25,3.92) 48(2.5,-3.63) 49(2.75,3.92) 50(3,-3.63) 51(3.25,3.92) 52(3.5,-3.63) 53(3.75,3.92) 54(4,-3.63) 55(4.25,3.92) 56(4.5,-3.63) 57(4.75,3.92) 58(5,-3.63) 59(5.25,3.92) 60(5.5,-3.63) 61(5.75,3.92) 62(6,-3.63) 63(6.25,3.92) 64(6.5,-3.63) 65(6.75,3.92) 66(7,-3.63) 67(7.25,3.92) 68(7.5,-3.63) 69(7.75,3.92) 70(8,-3.63) 71(8.25,3.92) 72(8.5,-3.63) 73(8.75,3.92) 74(9,-3.63) 75(9.25,3.92)
  rect 1.2x2.75 smd: 76(-10.35,3.145) 77(10.35,3.145)
  round 1.1 hole 1.1 unplated: ""(-10,-1.355)
  round 1.6 hole 1.6 unplated: ""(10,-1.355)
  silkscreen extent -11,-3.9 11,5.39
MH_M2.5_PLATED [mm] "Mounting hole M2.5, plated, 2.75 mm hole, 6.2 mm pad (Raspberry Pi HAT pattern)"
  round 6.2 hole 2.75: 1(0,0)
MICROSD_HRO_TF-01A [mm] "HRO TF-01A push-push microSD socket with card detect, SMD"
  rrect50% 0.7x1.3 smd: 1(2.195,7.6) 2(1.095,7.6) 3(-0.005,7.6) 4(-1.105,7.6) 5(-2.205,7.6) 6(-3.305,7.6) 7(-4.405,7.6) 8(-5.505,7.6) 9(-6.605,7.6)
  rrect50% 1.2x1.4 smd: 10(-7.705,6.75) 11(6.975,6.75)
  rrect50% 1.2x2 smd: 12(-7.705,-2.95) 13(7.815,-2.95)
  round 1 hole 1 unplated: ""(-4.895,-3.24) ""(3.105,-3.24)
  silkscreen extent -7.39,-7.25 7.39,8.77
OSC_2520_4P [mm] "Oscillator 2.5x2.0 mm 4-pad (1 OE, 2 GND, 3 OUT, 4 VDD), ECS suggested land"
  rrect50% 0.8x0.9 smd: 1(-0.725,0.925) 2(-0.725,-0.925) 3(0.725,-0.925) 4(0.725,0.925)
  silkscreen extent -1.64,0.83 -1.45,1.02
OSC_3225_4P [mm] "Oscillator 3.2x2.5 mm 4-pad (1 OE, 2 GND, 3 OUT, 4 VDD), SJK suggested land"
  rrect50% 1.2x1.4 smd: 1(-0.85,1.1) 2(-0.85,-1.1) 3(0.85,-1.1) 4(0.85,1.1)
  silkscreen extent -1.97,1 -1.77,1.2
OSD62X-PM_BGA500 [mm] "Octavo OSD62x-PM SiP, 500-ball BGA 9x14 mm, 0.5 mm pitch, 0.20 mm NSMD lands"
  round 0.2 smd: A2(-6.25,4.25) A3(-5.75,4.25) A4(-5.25,4.25) A5(-4.75,4.25) A6(-4.25,4.25) A7(-3.75,4.25) A8(-3.25,4.25) A9(-2.75,4.25) A10(-2.25,4.25) A11(-1.75,4.25) A12(-1.25,4.25) A13(-0.75,4.25) A14(-0.25,4.25) A15(0.25,4.25) A16(0.75,4.25) A17(1.25,4.25) A18(1.75,4.25) A19(2.25,4.25) A20(2.75,4.25) A21(3.25,4.25) A22(3.75,4.25) A23(4.25,4.25) A24(4.75,4.25) A25(5.25,4.25) A26(5.75,4.25) A27(6.25,4.25) B1(-6.75,3.75) B2(-6.25,3.75) B3(-5.75,3.75) B4(-5.25,3.75) B5(-4.75,3.75) B6(-4.25,3.75) B7(-3.75,3.75) B8(-3.25,3.75) B9(-2.75,3.75) B10(-2.25,3.75) B11(-1.75,3.75) B12(-1.25,3.75) B13(-0.75,3.75) B14(-0.25,3.75) B15(0.25,3.75) B16(0.75,3.75) B17(1.25,3.75) B18(1.75,3.75) B19(2.25,3.75) B20(2.75,3.75) B21(3.25,3.75) B22(3.75,3.75) B23(4.25,3.75) B24(4.75,3.75) B25(5.25,3.75) B26(5.75,3.75) B27(6.25,3.75) B28(6.75,3.75) C1(-6.75,3.25) C2(-6.25,3.25) C3(-5.75,3.25) C4(-5.25,3.25) C5(-4.75,3.25) C6(-4.25,3.25) C7(-3.75,3.25) C8(-3.25,3.25) C9(-2.75,3.25) C10(-2.25,3.25) C11(-1.75,3.25) C12(-1.25,3.25) C13(-0.75,3.25) C14(-0.25,3.25) C15(0.25,3.25) C16(0.75,3.25) C17(1.25,3.25) C18(1.75,3.25) C19(2.25,3.25) C20(2.75,3.25) C21(3.25,3.25) C22(3.75,3.25) C23(4.25,3.25) C24(4.75,3.25) C25(5.25,3.25) C26(5.75,3.25) C27(6.25,3.25) C28(6.75,3.25) D1(-6.75,2.75) D2(-6.25,2.75) D3(-5.75,2.75) D4(-5.25,2.75) D5(-4.75,2.75) D6(-4.25,2.75) D7(-3.75,2.75) D8(-3.25,2.75) D9(-2.75,2.75) D10(-2.25,2.75) D11(-1.75,2.75) D12(-1.25,2.75) D13(-0.75,2.75) D14(-0.25,2.75) D15(0.25,2.75) D16(0.75,2.75) D17(1.25,2.75) D18(1.75,2.75) D19(2.25,2.75) D20(2.75,2.75) D21(3.25,2.75) D22(3.75,2.75) D23(4.25,2.75) D24(4.75,2.75) D25(5.25,2.75) D26(5.75,2.75) D27(6.25,2.75) D28(6.75,2.75) E1(-6.75,2.25) E2(-6.25,2.25) E3(-5.75,2.25) E4(-5.25,2.25) E5(-4.75,2.25) E6(-4.25,2.25) E7(-3.75,2.25) E8(-3.25,2.25) E9(-2.75,2.25) E10(-2.25,2.25) E11(-1.75,2.25) E12(-1.25,2.25) E13(-0.75,2.25) E14(-0.25,2.25) E15(0.25,2.25) E16(0.75,2.25) E17(1.25,2.25) E18(1.75,2.25) E19(2.25,2.25) E20(2.75,2.25) E21(3.25,2.25) E22(3.75,2.25) E23(4.25,2.25) E24(4.75,2.25) E25(5.25,2.25) E26(5.75,2.25) E27(6.25,2.25) E28(6.75,2.25) F1(-6.75,1.75) F2(-6.25,1.75) F3(-5.75,1.75) F4(-5.25,1.75) F5(-4.75,1.75) F6(-4.25,1.75) F7(-3.75,1.75) F8(-3.25,1.75) F9(-2.75,1.75) F10(-2.25,1.75) F11(-1.75,1.75) F12(-1.25,1.75) F13(-0.75,1.75) F14(-0.25,1.75) F15(0.25,1.75) F16(0.75,1.75) F17(1.25,1.75) F18(1.75,1.75) F19(2.25,1.75) F20(2.75,1.75) F21(3.25,1.75) F22(3.75,1.75) F23(4.25,1.75) F24(4.75,1.75) F25(5.25,1.75) F26(5.75,1.75) F27(6.25,1.75) F28(6.75,1.75) G1(-6.75,1.25) G2(-6.25,1.25) G3(-5.75,1.25) G4(-5.25,1.25) G5(-4.75,1.25) G6(-4.25,1.25) G7(-3.75,1.25) G8(-3.25,1.25) G9(-2.75,1.25) G10(-2.25,1.25) G11(-1.75,1.25) G12(-1.25,1.25) G13(-0.75,1.25) G14(-0.25,1.25) G15(0.25,1.25) G16(0.75,1.25) G17(1.25,1.25) G18(1.75,1.25) G19(2.25,1.25) G20(2.75,1.25) G21(3.25,1.25) G22(3.75,1.25) G23(4.25,1.25) G24(4.75,1.25) G25(5.25,1.25) G26(5.75,1.25) G27(6.25,1.25) G28(6.75,1.25) H1(-6.75,0.75) H2(-6.25,0.75) H3(-5.75,0.75) H4(-5.25,0.75) H5(-4.75,0.75) H6(-4.25,0.75) H7(-3.75,0.75) H8(-3.25,0.75) H9(-2.75,0.75) H10(-2.25,0.75) H11(-1.75,0.75) H12(-1.25,0.75) H13(-0.75,0.75) H14(-0.25,0.75) H15(0.25,0.75) H16(0.75,0.75) H17(1.25,0.75) H18(1.75,0.75) H19(2.25,0.75) H20(2.75,0.75) H21(3.25,0.75) H22(3.75,0.75) H23(4.25,0.75) H24(4.75,0.75) H25(5.25,0.75) H26(5.75,0.75) H27(6.25,0.75) H28(6.75,0.75) J1(-6.75,0.25) J2(-6.25,0.25) J3(-5.75,0.25) J4(-5.25,0.25) J5(-4.75,0.25) J6(-4.25,0.25) J7(-3.75,0.25) J8(-3.25,0.25) J9(-2.75,0.25) J10(-2.25,0.25) J11(-1.75,0.25) J12(-1.25,0.25) J13(-0.75,0.25) J14(-0.25,0.25) J15(0.25,0.25) J16(0.75,0.25) J17(1.25,0.25) J18(1.75,0.25) J19(2.25,0.25) J20(2.75,0.25) J21(3.25,0.25) J22(3.75,0.25) J23(4.25,0.25) J24(4.75,0.25) J25(5.25,0.25) J26(5.75,0.25) J27(6.25,0.25) J28(6.75,0.25) K1(-6.75,-0.25) K2(-6.25,-0.25) K3(-5.75,-0.25) K4(-5.25,-0.25) K5(-4.75,-0.25) K6(-4.25,-0.25) K7(-3.75,-0.25) K8(-3.25,-0.25) K9(-2.75,-0.25) K10(-2.25,-0.25) K11(-1.75,-0.25) K12(-1.25,-0.25) K13(-0.75,-0.25) K14(-0.25,-0.25) K15(0.25,-0.25) K16(0.75,-0.25) K17(1.25,-0.25) K18(1.75,-0.25) K19(2.25,-0.25) K20(2.75,-0.25) K21(3.25,-0.25) K22(3.75,-0.25) K23(4.25,-0.25) K24(4.75,-0.25) K25(5.25,-0.25) K26(5.75,-0.25) K27(6.25,-0.25) K28(6.75,-0.25) L1(-6.75,-0.75) L2(-6.25,-0.75) L3(-5.75,-0.75) L4(-5.25,-0.75) L5(-4.75,-0.75) L6(-4.25,-0.75) L7(-3.75,-0.75) L8(-3.25,-0.75) L9(-2.75,-0.75) L10(-2.25,-0.75) L11(-1.75,-0.75) L12(-1.25,-0.75) L13(-0.75,-0.75) L14(-0.25,-0.75) L15(0.25,-0.75) L16(0.75,-0.75) L17(1.25,-0.75) L18(1.75,-0.75) L19(2.25,-0.75) L20(2.75,-0.75) L21(3.25,-0.75) L22(3.75,-0.75) L23(4.25,-0.75) L24(4.75,-0.75) L25(5.25,-0.75) L26(5.75,-0.75) L27(6.25,-0.75) L28(6.75,-0.75) M1(-6.75,-1.25) M2(-6.25,-1.25) M3(-5.75,-1.25) M4(-5.25,-1.25) M5(-4.75,-1.25) M6(-4.25,-1.25) M7(-3.75,-1.25) M8(-3.25,-1.25) M9(-2.75,-1.25) M10(-2.25,-1.25) M11(-1.75,-1.25) M12(-1.25,-1.25) M13(-0.75,-1.25) M14(-0.25,-1.25) M15(0.25,-1.25) M16(0.75,-1.25) M17(1.25,-1.25) M18(1.75,-1.25) M19(2.25,-1.25) M20(2.75,-1.25) M21(3.25,-1.25) M22(3.75,-1.25) M23(4.25,-1.25) M24(4.75,-1.25) M25(5.25,-1.25) M26(5.75,-1.25) M27(6.25,-1.25) M28(6.75,-1.25) N1(-6.75,-1.75) N2(-6.25,-1.75) N3(-5.75,-1.75) N4(-5.25,-1.75) N5(-4.75,-1.75) N6(-4.25,-1.75) N7(-3.75,-1.75) N8(-3.25,-1.75) N9(-2.75,-1.75) N10(-2.25,-1.75) N11(-1.75,-1.75) N12(-1.25,-1.75) N13(-0.75,-1.75) N14(-0.25,-1.75) N15(0.25,-1.75) N16(0.75,-1.75) N17(1.25,-1.75) N18(1.75,-1.75) N19(2.25,-1.75) N20(2.75,-1.75) N21(3.25,-1.75) N22(3.75,-1.75) N23(4.25,-1.75) N24(4.75,-1.75) N25(5.25,-1.75) N26(5.75,-1.75) N27(6.25,-1.75) N28(6.75,-1.75) P1(-6.75,-2.25) P2(-6.25,-2.25) P3(-5.75,-2.25) P4(-5.25,-2.25) P5(-4.75,-2.25) P6(-4.25,-2.25) P7(-3.75,-2.25) P8(-3.25,-2.25) P9(-2.75,-2.25) P10(-2.25,-2.25) P11(-1.75,-2.25) P12(-1.25,-2.25) P13(-0.75,-2.25) P14(-0.25,-2.25) P15(0.25,-2.25) P16(0.75,-2.25) P17(1.25,-2.25) P18(1.75,-2.25) P19(2.25,-2.25) P20(2.75,-2.25) P21(3.25,-2.25) P22(3.75,-2.25) P23(4.25,-2.25) P24(4.75,-2.25) P25(5.25,-2.25) P26(5.75,-2.25) P27(6.25,-2.25) P28(6.75,-2.25) R1(-6.75,-2.75) R2(-6.25,-2.75) R3(-5.75,-2.75) R4(-5.25,-2.75) R5(-4.75,-2.75) R6(-4.25,-2.75) R7(-3.75,-2.75) R8(-3.25,-2.75) R9(-2.75,-2.75) R10(-2.25,-2.75) R11(-1.75,-2.75) R12(-1.25,-2.75) R13(-0.75,-2.75) R14(-0.25,-2.75) R15(0.25,-2.75) R16(0.75,-2.75) R17(1.25,-2.75) R18(1.75,-2.75) R19(2.25,-2.75) R20(2.75,-2.75) R21(3.25,-2.75) R22(3.75,-2.75) R23(4.25,-2.75) R24(4.75,-2.75) R25(5.25,-2.75) R26(5.75,-2.75) R27(6.25,-2.75) R28(6.75,-2.75) T1(-6.75,-3.25) T2(-6.25,-3.25) T3(-5.75,-3.25) T4(-5.25,-3.25) T5(-4.75,-3.25) T6(-4.25,-3.25) T7(-3.75,-3.25) T8(-3.25,-3.25) T9(-2.75,-3.25) T10(-2.25,-3.25) T11(-1.75,-3.25) T12(-1.25,-3.25) T13(-0.75,-3.25) T14(-0.25,-3.25) T15(0.25,-3.25) T16(0.75,-3.25) T17(1.25,-3.25) T18(1.75,-3.25) T19(2.25,-3.25) T20(2.75,-3.25) T21(3.25,-3.25) T22(3.75,-3.25) T23(4.25,-3.25) T24(4.75,-3.25) T25(5.25,-3.25) T26(5.75,-3.25) T27(6.25,-3.25) T28(6.75,-3.25) U1(-6.75,-3.75) U2(-6.25,-3.75) U3(-5.75,-3.75) U4(-5.25,-3.75) U5(-4.75,-3.75) U6(-4.25,-3.75) U7(-3.75,-3.75) U8(-3.25,-3.75) U9(-2.75,-3.75) U10(-2.25,-3.75) U11(-1.75,-3.75) U12(-1.25,-3.75) U13(-0.75,-3.75) U14(-0.25,-3.75) U15(0.25,-3.75) U16(0.75,-3.75) U17(1.25,-3.75) U18(1.75,-3.75) U19(2.25,-3.75) U20(2.75,-3.75) U21(3.25,-3.75) U22(3.75,-3.75) U23(4.25,-3.75) U24(4.75,-3.75) U25(5.25,-3.75) U26(5.75,-3.75) U27(6.25,-3.75) U28(6.75,-3.75) V2(-6.25,-4.25) V3(-5.75,-4.25) V4(-5.25,-4.25) V5(-4.75,-4.25) V6(-4.25,-4.25) V7(-3.75,-4.25) V8(-3.25,-4.25) V9(-2.75,-4.25) V10(-2.25,-4.25) V11(-1.75,-4.25) V12(-1.25,-4.25) V13(-0.75,-4.25) V14(-0.25,-4.25) V15(0.25,-4.25) V16(0.75,-4.25) V17(1.25,-4.25) V18(1.75,-4.25) V19(2.25,-4.25) V20(2.75,-4.25) V21(3.25,-4.25) V22(3.75,-4.25) V23(4.25,-4.25) V24(4.75,-4.25) V25(5.25,-4.25) V26(5.75,-4.25) V27(6.25,-4.25)
  silkscreen extent -7.57,-4.65 7.15,5.07
QFN28_4X4_P0.4 [mm] "QFN-28 4x4 mm, 0.4 mm pitch, 2.7 mm exposed pad, IPC-7351B nominal lands (WCH CH335F)"
  rrect50% 0.825x0.2 smd: 1(-1.963,1.2) 2(-1.963,0.8) 3(-1.963,0.4) 4(-1.963,0) 5(-1.963,-0.4) 6(-1.963,-0.8) 7(-1.963,-1.2) 15(1.963,-1.2) 16(1.963,-0.8) 17(1.963,-0.4) 18(1.963,0) 19(1.963,0.4) 20(1.963,0.8) 21(1.963,1.2)
  rrect50% 0.2x0.825 smd: 8(-1.2,-1.963) 9(-0.8,-1.963) 10(-0.4,-1.963) 11(0,-1.963) 12(0.4,-1.963) 13(0.8,-1.963) 14(1.2,-1.963) 22(1.2,1.963) 23(0.8,1.963) 24(0.4,1.963) 25(0,1.963) 26(-0.4,1.963) 27(-0.8,1.963) 28(-1.2,1.963)
  rect 2.7x2.7 smd: 29(0,0)
  silkscreen extent -2.89,-2 2,2
R0402 [mm] "Chip resistor 0402 (1005), UNI-ROYAL recommended land"
  rrect50% 0.45x0.5 smd: 1(-0.475,0) 2(0.475,0)
RJ45_HANRUN_HR911130A [mm] "HanRun HR911130A RJ45 MagJack 1000BASE-T with LEDs, shielded, THT (HanRun mounting pattern)"
  round 1.5 hole 0.89: 1(-5.715,9.16) 2(-4.445,6.62) 3(-3.175,9.16) 4(-1.905,6.62) 5(-0.635,9.16) 6(0.635,6.62) 7(1.905,9.16) 8(3.175,6.62) 9(4.445,9.16) 10(5.715,6.62)
  round 1.6 hole 1.02: 11(-6.625,-4.63) 12(-4.085,-4.63) 13(4.085,-4.63) 14(6.625,-4.63)
  round 2.3 hole 1.63: 15(-7.745,3.32) 16(7.745,3.32)
  round 3.25 hole 3.25 unplated: ""(-5.715,0.27) ""(5.715,0.27)
  silkscreen extent -8.05,-10.65 8.05,11.17
SC70-6 [mm] "SC70-6 / SOT-363 (TI DCK0006A), 0.65 mm pitch, 0.9 x 0.4 mm pads"
  rrect50% 0.9x0.4 smd: 1(-1.1,0.65) 2(-1.1,0) 3(-1.1,-0.65) 4(1.1,-0.65) 5(1.1,0) 6(1.1,0.65)
  silkscreen extent -2.07,-1 0.38,1
SOD323 [mm] "SOD-323 (SC-76) diode, pad 1 anode / pad 2 cathode, Diodes Inc. suggested pad layout"
  rrect50% 0.59x0.45 smd: 1(-1.055,0) 2(1.055,0)
  silkscreen extent -0.85,-0.65 1.65,0.65
SOIC8_3.9X4.9_P1.27 [mm] "SOIC-8 3.9x4.9 mm, 1.27 mm pitch (Microchip SN / Atmel 8S1), Microchip C04-2057-SN land"
  rrect50% 1.55x0.6 smd: 1(-2.7,1.905) 2(-2.7,0.635) 3(-2.7,-0.635) 4(-2.7,-1.905) 5(2.7,-1.905) 6(2.7,-0.635) 7(2.7,0.635) 8(2.7,1.905)
  silkscreen extent -3.99,-2.45 1.65,2.45
SOT23-3 [mm] "SOT-23 3-lead (LRC soldering footprint), 0.95 mm pitch, 0.9 x 0.8 mm pads"
  rrect50% 0.9x0.8 smd: 1(-1,0.95) 2(-1,-0.95) 3(1,0)
  silkscreen extent -1.97,-1.46 0.65,1.46
SOT23-5 [mm] "SOT-23-5 (TI DBV0005A), 0.95 mm pitch, 1.1 x 0.6 mm pads"
  rrect50% 1.1x0.6 smd: 1(-1.3,0.95) 2(-1.3,0) 3(-1.3,-0.95) 4(1.3,-0.95) 5(1.3,0.95)
  silkscreen extent -2.37,-1.45 0.8,1.45
SOT23-6 [mm] "SOT-23-6 (TI DBV0006A), 0.95 mm pitch, 1.1 x 0.6 mm pads"
  rrect50% 1.1x0.6 smd: 1(-1.3,0.95) 2(-1.3,0) 3(-1.3,-0.95) 4(1.3,-0.95) 5(1.3,0) 6(1.3,0.95)
  silkscreen extent -2.37,-1.45 0.48,1.45
SOT553-5 [mm] "SOT-553 5-lead (TI DRL0005A), 0.5 mm pitch, 0.67 x 0.3 mm pads"
  rrect50% 0.67x0.3 smd: 1(-0.74,0.5) 2(-0.74,0) 3(-0.74,-0.5) 4(0.74,-0.5) 5(0.74,0.5)
  silkscreen extent -1.59,0.4 -1.4,0.6
SOT563-6 [mm] "SOT-563 6-lead (TI DRL0006A), 0.5 mm pitch, 0.67 x 0.3 mm pads"
  rrect50% 0.67x0.3 smd: 1(-0.74,0.5) 2(-0.74,0) 3(-0.74,-0.5) 4(0.74,-0.5) 5(0.74,0) 6(0.74,0.5)
  silkscreen extent -1.59,0.4 -1.4,0.6
SOT583-8 [mm] "TI DRL0008A SOT-583-8 (SOT-5X3) 1.2x2.1 mm, 0.5 mm pitch (TPS22996)"
  rrect33% 0.67x0.3 smd: 1(-0.74,0.75) 2(-0.74,0.25) 3(-0.74,-0.25) 4(-0.74,-0.75) 5(0.74,-0.75) 6(0.74,-0.25) 7(0.74,0.25) 8(0.74,0.75)
  silkscreen extent -1.59,0.65 -1.4,0.85
STANDOFF_WE_9774015243R [mm] "Wurth WA-SMSI 9774015243R SMT spacer M2 L1.5, 5.3 mm ring pad, 3.0 mm NPTH"
  round 5.3 hole 3 unplated: 1(0,0)
SW_DIP4_SMD_2.54 [mm] "DIP switch 4-position SPST, 2.54 mm SMD gull wing (SHOU HAN 2.54-4P TPGT)"
  rrect50% 1.1x2.2 smd: 1(-3.81,-4.4) 2(-1.27,-4.4) 3(1.27,-4.4) 4(3.81,-4.4) 5(3.81,4.4) 6(1.27,4.4) 7(-1.27,4.4) 8(-3.81,4.4)
  silkscreen extent -5.08,-6.02 5.08,3.08
SW_TACT_5.1X5.1_SMD4 [mm] "Tactile switch 5.1x5.1 mm SPST-NO, 4 SMD terminals A=B / C=D (XKB TS-1187A)"
  rrect50% 1x0.75 smd: 1(-3,1.875) 2(3,1.875) 3(-3,-1.875) 4(3,-1.875)
  silkscreen extent -2.55,-2.55 2.55,2.55
TC2070-NL [mm] "Tag-Connect TC2070-NL plug-of-nails footprint, 14 pads, no paste, 3 NPTH (not a part, DNL)"
  round 0.787 smd: 1(-3.81,-0.635) 2(-2.54,-0.635) 3(-1.27,-0.635) 4(0,-0.635) 5(1.27,-0.635) 6(2.54,-0.635) 7(3.81,-0.635) 8(3.81,0.635) 9(2.54,0.635) 10(1.27,0.635) 11(0,0.635) 12(-1.27,0.635) 13(-2.54,0.635) 14(-3.81,0.635)
  round 0.99 hole 0.99 unplated: ""(-5.08,0) ""(5.08,-1.016) ""(5.08,1.016)
  silkscreen extent -8.25,-3.52 8.25,3
TP_PAD_1.0 [mm] "Test pad, 1.0 mm round SMD"
  round 1 smd: 1(0,0)
TSSOP8_4.4X3.0_P0.65 [mm] "TSSOP-8 4.4x3.0 mm, 0.65 mm pitch (MO-153 AA), TI PW0008A land"
  rrect22% 1.5x0.45 smd: 1(-2.9,0.975) 2(-2.9,0.325) 3(-2.9,-0.325) 4(-2.9,-0.975) 5(2.9,-0.975) 6(2.9,-0.325) 7(2.9,0.325) 8(2.9,0.975)
  silkscreen extent -4.17,-1.5 2.2,1.5
TSSOP16_4.4X5.0_P0.65 [mm] "TSSOP-16 4.4x5.0 mm, 0.65 mm pitch (TI PW0016A), TI example board layout"
  rrect22% 1.5x0.45 smd: 1(-2.9,2.275) 2(-2.9,1.625) 3(-2.9,0.975) 4(-2.9,0.325) 5(-2.9,-0.325) 6(-2.9,-0.975) 7(-2.9,-1.625) 8(-2.9,-2.275) 9(2.9,-2.275) 10(2.9,-1.625) 11(2.9,-0.975) 12(2.9,-0.325) 13(2.9,0.325) 14(2.9,0.975) 15(2.9,1.625) 16(2.9,2.275)
  silkscreen extent -4.17,-2.5 1.88,2.5
TSSOP24_4.4X7.8_P0.65 [mm] "TSSOP-24 4.4x7.8 mm, 0.65 mm pitch (TI PW0024A), TI example board layout"
  rrect22% 1.5x0.45 smd: 1(-2.9,3.575) 2(-2.9,2.925) 3(-2.9,2.275) 4(-2.9,1.625) 5(-2.9,0.975) 6(-2.9,0.325) 7(-2.9,-0.325) 8(-2.9,-0.975) 9(-2.9,-1.625) 10(-2.9,-2.275) 11(-2.9,-2.925) 12(-2.9,-3.575) 13(2.9,-3.575) 14(2.9,-2.925) 15(2.9,-2.275) 16(2.9,-1.625) 17(2.9,-0.975) 18(2.9,-0.325) 19(2.9,0.325) 20(2.9,0.975) 21(2.9,1.625) 22(2.9,2.275) 23(2.9,2.925) 24(2.9,3.575)
  silkscreen extent -4.17,-3.9 1.88,3.9
USB-C_HRO_TYPE-C-31-M-12 [mm] "HRO TYPE-C-31-M-12 USB 2.0 Type-C receptacle, SMD + 4 plated shell slots"
  rrect50% 0.6x1.14 smd: A1B12(-3.2,3.675) A4B9(-2.4,3.675) B1A12(3.2,3.675) B4A9(2.4,3.675)
  rrect50% 0.3x1.14 smd: A5(-1.25,3.675) A6(-0.25,3.675) A7(0.25,3.675) A8(1.25,3.675) B5(1.75,3.675) B6(0.75,3.675) B7(-0.75,3.675) B8(-1.75,3.675)
  oval 0.9x1.7 hole 0.6 slot 1.4 at 90 deg: S1(-4.325,-1.075) S2(4.325,-1.075)
  oval 0.9x2 hole 0.6 slot 1.7 at 90 deg: S3(-4.325,3.105) S4(4.325,3.105)
  round 0.6 hole 0.6 unplated: ""(-2.89,2.605) ""(2.89,2.605)
  silkscreen extent -4.47,-3.67 4.47,4.76
USBA_2X_BX-TYPE-A-MWC44 [mm] "Bossie BX-TYPE-A-MWC44 dual stacked USB 2.0 Type-A receptacle, THT right angle"
  round 1.5 hole 0.9: 1(-3.5,4.09) 2(-1,4.09) 3(1,4.09) 4(3.5,4.09) 5(-3.5,6.8) 6(-1,6.8) 7(1,6.8) 8(3.5,6.8)
  round 3 hole 2.3: 9(-6.57,1.47) 10(6.57,1.47) 11(-6.57,7.15) 12(6.57,7.15)
  silkscreen extent -8.12,-8.5 7.6,8.5
USON10_DQA [mm] "USON-10 1x2.5 mm (TI DQA0010A/B), 0.5 mm pitch"
  rrect50% 0.565x0.2 smd: 1(-0.417,1) 2(-0.417,0.5) 4(-0.417,-0.5) 5(-0.417,-1) 6(0.417,-1) 7(0.417,-0.5) 9(0.417,0.5) 10(0.417,1)
  rrect50% 0.565x0.4 smd: 3(-0.417,0) 8(0.417,0)
  silkscreen extent -1.22,0.9 -1.02,1.1
VQFN32_RHB_5X5 [mm] "TI VQFN-32 (RHB0032E), 5x5 mm, 0.5 mm pitch, 3.45 mm thermal pad (TLV320AIC3104)"
  rrect50% 0.6x0.25 smd: 1(-2.4,1.75) 2(-2.4,1.25) 3(-2.4,0.75) 4(-2.4,0.25) 5(-2.4,-0.25) 6(-2.4,-0.75) 7(-2.4,-1.25) 8(-2.4,-1.75) 17(2.4,-1.75) 18(2.4,-1.25) 19(2.4,-0.75) 20(2.4,-0.25) 21(2.4,0.25) 22(2.4,0.75) 23(2.4,1.25) 24(2.4,1.75)
  rrect50% 0.25x0.6 smd: 9(-1.75,-2.4) 10(-1.25,-2.4) 11(-0.75,-2.4) 12(-0.25,-2.4) 13(0.25,-2.4) 14(0.75,-2.4) 15(1.25,-2.4) 16(1.75,-2.4) 25(1.75,2.4) 26(1.25,2.4) 27(0.75,2.4) 28(0.25,2.4) 29(-0.25,2.4) 30(-0.75,2.4) 31(-1.25,2.4) 32(-1.75,2.4)
  rect 3.45x3.45 smd: 33(0,0)
  silkscreen extent -3.22,-2.5 2.5,2.5
VQFN32_RSM_4X4 [mm] "TI RSM0032B VQFN-32 4x4 mm, 0.4 mm pitch, 2.8 mm exposed pad (TPS65219)"
  rrect50% 0.55x0.2 smd: 1(-1.925,1.4) 2(-1.925,1) 3(-1.925,0.6) 4(-1.925,0.2) 5(-1.925,-0.2) 6(-1.925,-0.6) 7(-1.925,-1) 8(-1.925,-1.4) 17(1.925,-1.4) 18(1.925,-1) 19(1.925,-0.6) 20(1.925,-0.2) 21(1.925,0.2) 22(1.925,0.6) 23(1.925,1) 24(1.925,1.4)
  rrect50% 0.2x0.55 smd: 9(-1.4,-1.925) 10(-1,-1.925) 11(-0.6,-1.925) 12(-0.2,-1.925) 13(0.2,-1.925) 14(0.6,-1.925) 15(1,-1.925) 16(1.4,-1.925) 25(1.4,1.925) 26(1,1.925) 27(0.6,1.925) 28(0.2,1.925) 29(-0.2,1.925) 30(-0.6,1.925) 31(-1,1.925) 32(-1.4,1.925)
  rect 2.8x2.8 smd: 33(0,0)
  silkscreen extent -2.72,-2 2,2
VQFN48_RGZ_7X7 [mm] "TI VQFN-48 (RGZ0048B), 7x7 mm, 0.5 mm pitch, 4.1 mm thermal pad (DP83867)"
  rrect50% 0.6x0.24 smd: 1(-3.4,2.75) 2(-3.4,2.25) 3(-3.4,1.75) 4(-3.4,1.25) 5(-3.4,0.75) 6(-3.4,0.25) 7(-3.4,-0.25) 8(-3.4,-0.75) 9(-3.4,-1.25) 10(-3.4,-1.75) 11(-3.4,-2.25) 12(-3.4,-2.75) 25(3.4,-2.75) 26(3.4,-2.25) 27(3.4,-1.75) 28(3.4,-1.25) 29(3.4,-0.75) 30(3.4,-0.25) 31(3.4,0.25) 32(3.4,0.75) 33(3.4,1.25) 34(3.4,1.75) 35(3.4,2.25) 36(3.4,2.75)
  rrect50% 0.24x0.6 smd: 13(-2.75,-3.4) 14(-2.25,-3.4) 15(-1.75,-3.4) 16(-1.25,-3.4) 17(-0.75,-3.4) 18(-0.25,-3.4) 19(0.25,-3.4) 20(0.75,-3.4) 21(1.25,-3.4) 22(1.75,-3.4) 23(2.25,-3.4) 24(2.75,-3.4) 37(2.75,3.4) 38(2.25,3.4) 39(1.75,3.4) 40(1.25,3.4) 41(0.75,3.4) 42(0.25,3.4) 43(-0.25,3.4) 44(-0.75,3.4) 45(-1.25,3.4) 46(-1.75,3.4) 47(-2.25,3.4) 48(-2.75,3.4)
  rect 4.1x4.1 smd: 49(0,0)
  silkscreen extent -4.22,-3.5 3.5,3.5
VQFN-HR14_RJR_3.5X4 [mm] "TI RJR0014A VQFN-HR-14 4x3.5 mm HotRod, no exposed pad (LM61460)"
  rrect25% 0.7x0.4 smd: 1(-1.85,1.15) 5(-1.85,-1.15)
  rrect29% 0.35x1 smd: 1(-1.675,1.45) 5(-1.675,-1.45)
  rrect40% 0.7x0.25 smd: 2(-1.85,0.525) 4(-1.85,-0.525)
  rrect33% 0.7x0.3 smd: 3(-1.85,0)
  rrect40% 0.25x0.7 smd: 6(-1.125,-1.6) 7(-0.625,-1.6) 13(-0.625,1.6) 14(-1.125,1.6)
  rrect25% 0.4x1 smd: 8(0.45,-1.45) 9(1.6,-1.45) 11(1.6,1.45) 12(0.45,1.45)
  rrect25% 0.8x0.4 smd: 9(1.8,-1.15) 11(1.8,1.15)
  rrect25% 2.4x0.4 smd: 10(1,0)
  silkscreen extent -2.72,1.05 -2.52,1.25
VQFN-HR15_RNM_2.5X3 [mm] "TI RNM0015A VQFN-HR-15 2.5x3 mm HotRod, no exposed pad (TPS63070)"
  rrect40% 0.6x0.25 smd: 1(-1.15,0.75) 2(-1.15,0.25) 3(-1.15,-0.25) 4(-1.15,-0.75)
  rrect40% 0.25x0.6 smd: 5(-0.725,-1.4) 6(-0.225,-1.4) 7(0.275,-1.4) 8(0.775,-1.4) 12(0.775,1.4) 13(0.275,1.4) 14(-0.225,1.4) 15(-0.725,1.4)
  rrect40% 0.75x0.25 smd: 7(0.525,-1.225) 12(0.525,1.225)
  rrect40% 1.35x0.25 smd: 9(0.775,-0.5) 11(0.775,0.5)
  rrect40% 1.7x0.25 smd: 10(0.6,0)
  silkscreen extent -1.97,-1.5 1.25,1.5